# Altium PCB Relay-Switching-Board-v2.0.PcbDoc (part 4 of 5)
Units mil, origin at the board's own origin, x right, y up, seen from the top; angles counter-clockwise.
Board outline 5905.51 x 4330.71 mil, 4 copper layers (Top Layer, Layer 1, Layer 2, Bottom Layer), stack 62.047 mil thick; 211 components, 133 nets, 602 pads, 336 vias.
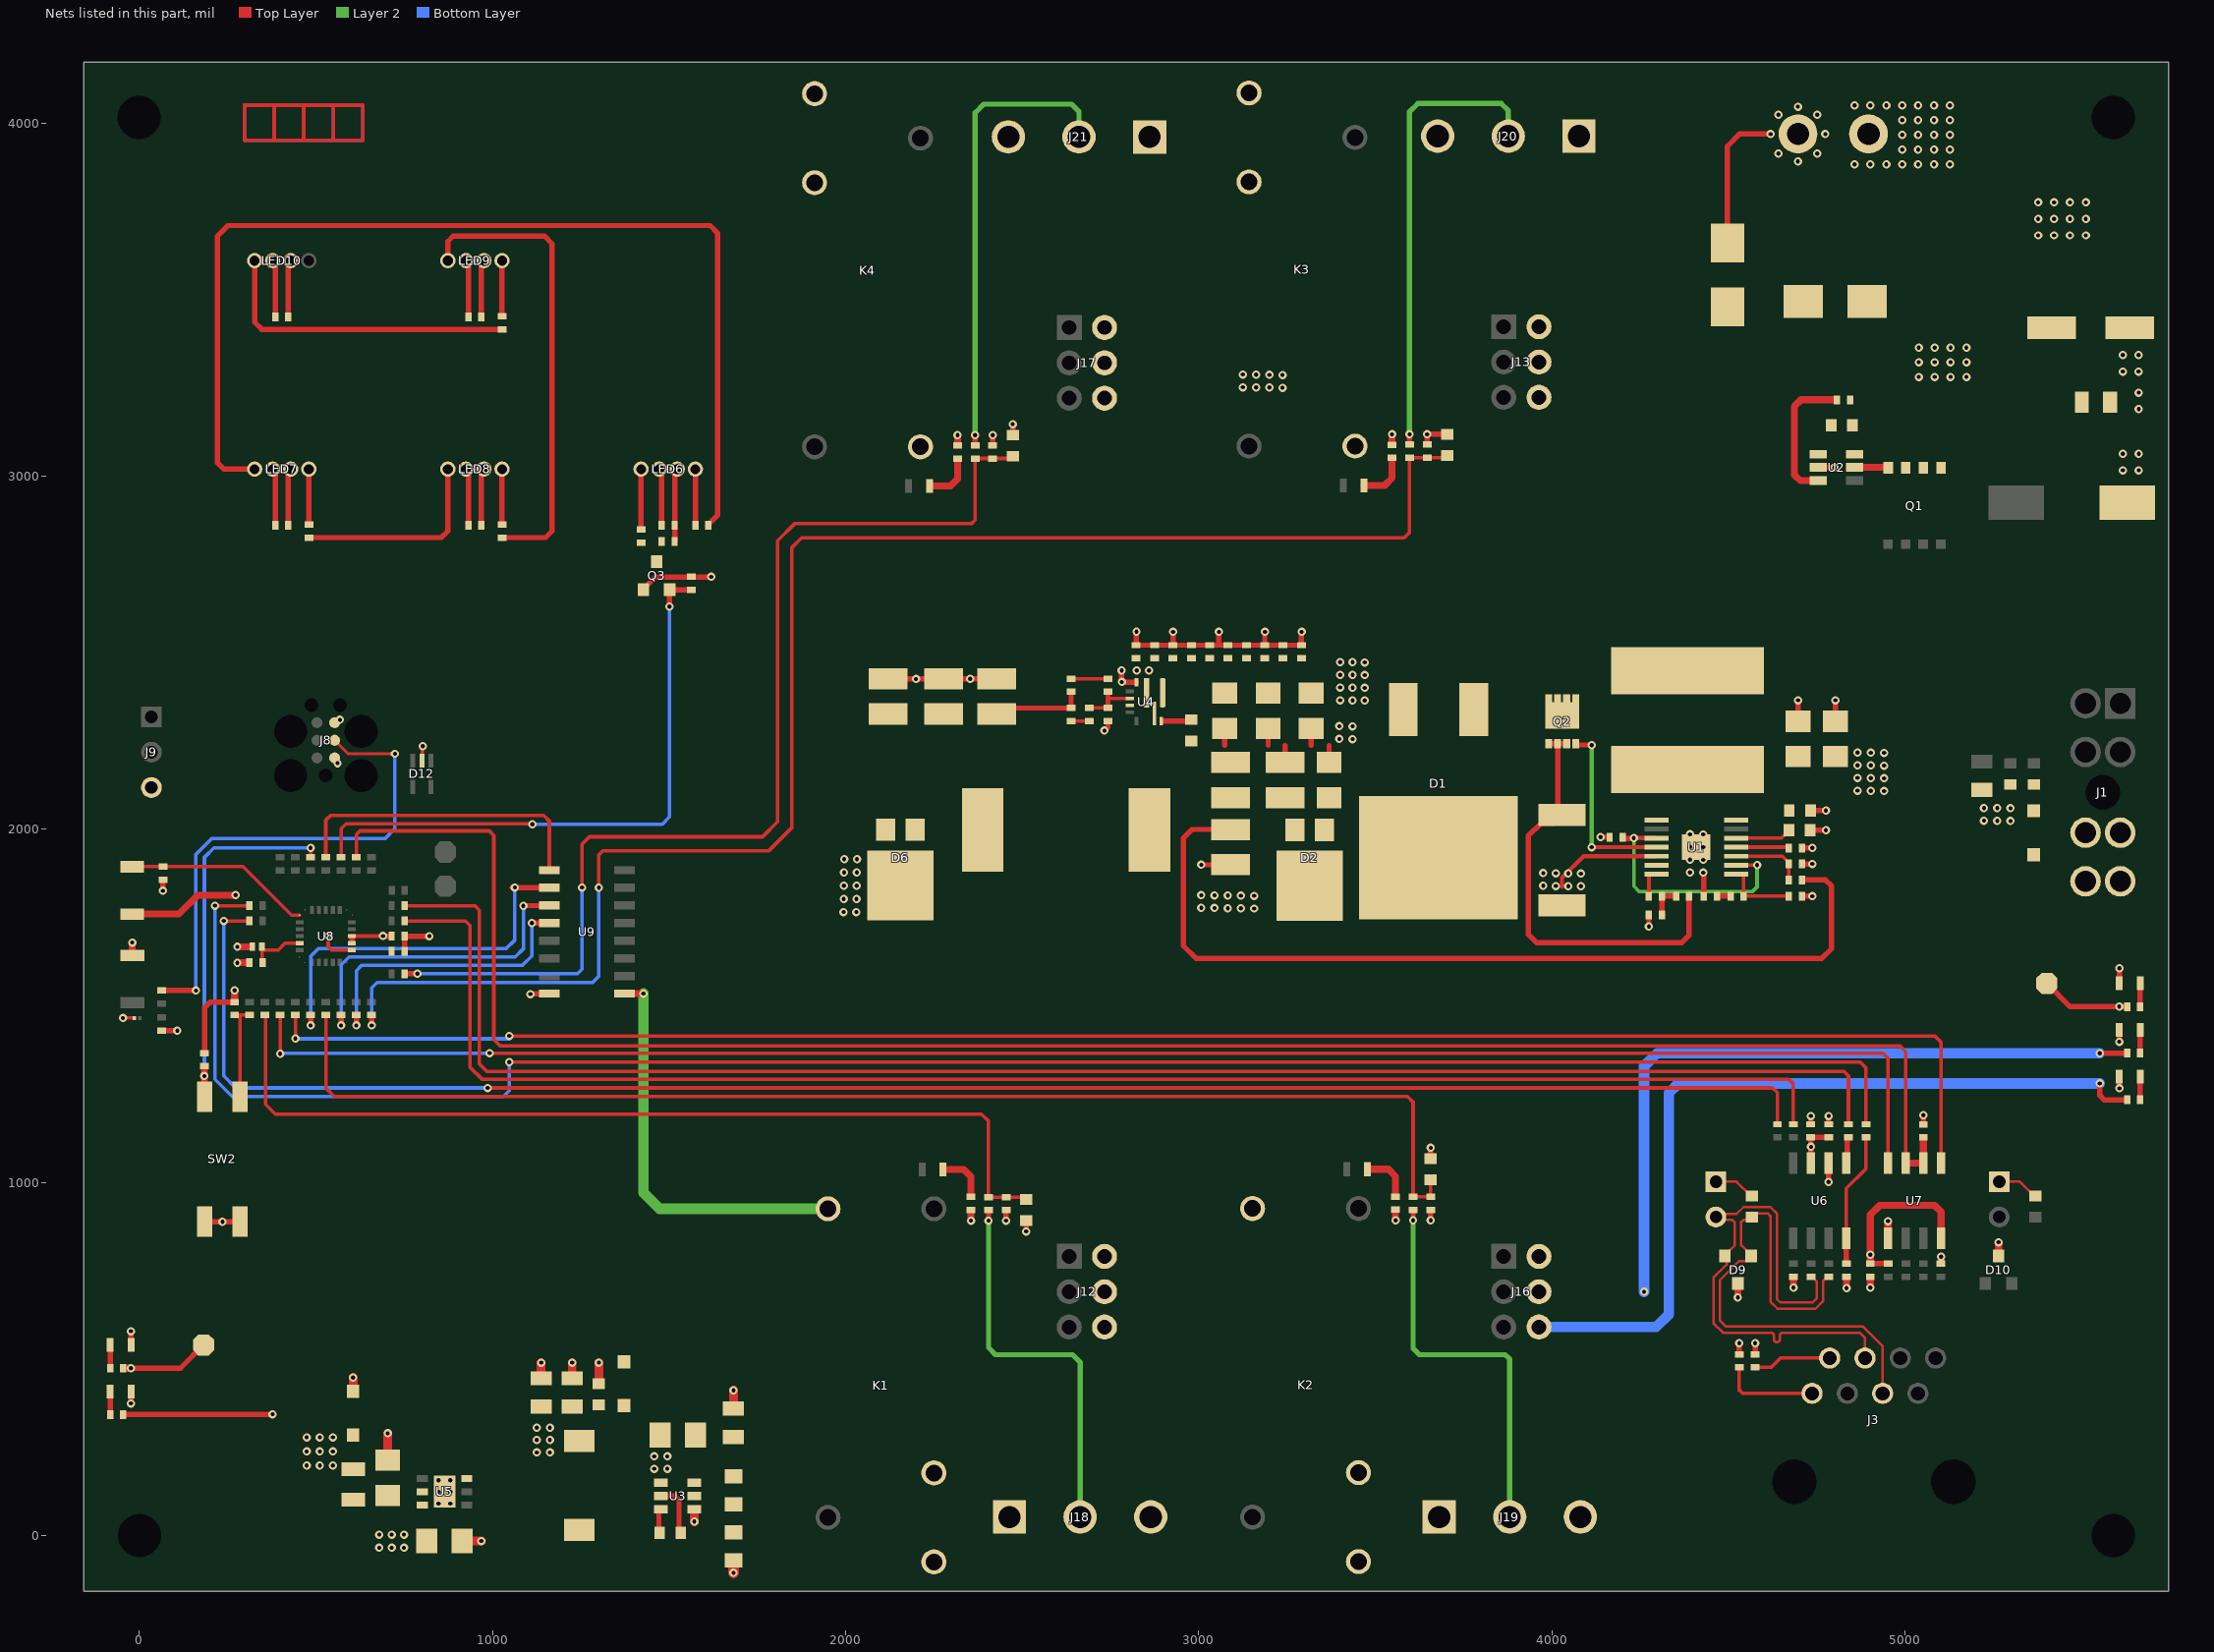
[diagram p4: the nets of this part, all layers, seen from the top]

## Via types
v1: diameter 23.62, hole 11.81, Top Layer to Bottom Layer, tented both sides, 336 vias

## Nets (pads, with @x,y where several pads share a name; then routed paths per layer and width w, separated by ;. In a path a pad name is that pad's centre, name@x,y a point inside that pad or via, vN(x,y) a via of type N, cw(c..) or ccw(c..) an arc to the next point about the centre after c; other vN are vias at no path point) (continued)
5V: C40.2 C41.2 C42.2 C44.2 C48.2 C50.2 C51.2 C52.2 C53.2 D7.2 L3.2 LED6.2 LED7.2 LED8.2 LED9.2 LED10.2 R17.1 R66.2 TP2.1 U3.1 U5.3 | length 1143.5
  Top Layer w15: v1(-23.65,473.9) 116.11,473.9 TP2.1@181.82,539.63 ; C51.2@421.55,2860.63 421.54,3004.53 428.63,3011.62 LED7.2@428.63,3020.63 ; C53.2@421.54,3450.63 421.54,3594.53 428.63,3601.62 LED10.2@428.63,3610.63 ; C52.2@968.67,2860.63 968.67,3004.53 975.76,3011.62 LED8.2@975.76,3020.63 ; C50.2@968.67,3450.64 968.67,3594.53 975.76,3601.62 LED9.2@975.76,3610.63 ; R66.2@1515.91,2814.78 1515.91,3005.21 1523.12,3012.42 LED6.2@1523.12,3020.08
  Top Layer w20: R17.1@-43.64,473.9 v1(-23.65,473.9)
  Top Layer w25: v1(1571.66,39.63) U3.1@1571.66,70.46
  other v1: 679.29,-34.37 714.29,-34.37 749.29,-34.37 679.29,2.63 714.29,2.63 749.29,2.63 1125.54,235.54 1162.54,235.54 1125.54,270.54 1162.54,270.54 1125.54,305.54 1162.54,305.54
12V: D6.3 J12.2 J13.2 J16.2 J17.2 R18.1 | length 2021.6
  Top Layer w15: v1(5551.71,1365.67) 5551.98,1365.94 5628.95,1365.94 R18.1@5629.22,1366.21
  Bottom Layer w30: v1(4261.29,690.57) 4261.29,1328.69 4298.27,1365.67 v1(5551.71,1365.67)
  other v1: 1994.27,1765.63 2030.29,1765.63 1994.74,1803.07 2030.76,1803.07 1995.21,1840.52 2031.23,1840.52 1995.68,1877.96 2031.7,1877.96 1996.15,1915.4 2032.17,1915.4
24V: C1.2 C2.2 C16.2 C22.2 C23.2 C24.2 C25.2 C26.2 C27.2 C28.2 C29.2 C30.2 C31.2 C32.2 C33.2 C34.2 C35.2 C36.2 D4.2 J1.3 J1.4 J1.5 J1.6 J12.4 J13.4 J16.4 J17.4 K1.1 K2.1 K3.1 K4.1 L1.1 R5.1 R11.2 R68.1 R69.1 R70.1 R71.1 TP1.1 U1.1 U1.14 U3.3 U4.8 U9.9 | length 1527.9
  Top Layer w15: TP1.1@5401.78,1563.93 5467.77,1497.94 R5.1@5629.22,1497.94
  Top Layer w20: U9.9@1373.59,1534.63 v1(1427.29,1534.63) ; R71.1@2317.09,3088.08 v1(2317.09,3116.71) ; v1(2355.03,891.98) R68.1@2355.03,920.61 ; R70.1@3547.5,3090.22 v1(3547.5,3118.85) ; v1(3557.45,892.84) R69.1@3557.45,921.47
  Layer 2 w30: v1(1427.29,1534.63) 1427.29,971.63 1473.47,925.46 K1.1@1950.07,925.46
  other v1: 5606.84,1497.94 4940.84,2108.55 4865.96,2109.49 4903.4,2109.02 4940.84,2144.57 4865.96,2145.51 4903.4,2145.04 4940.84,2180.59 4865.96,2181.53 4903.4,2181.06 4940.84,2216.62 4865.96,2217.56 4903.4,2217.09 3470.18,2364.69 3400.29,2365.63 3435.74,2365.16 3470.18,2400.71 3400.29,2401.65 3435.74,2401.18 3470.18,2436.74 3400.29,2437.68 3435.74,2437.21 3400.29,2473.7 3435.74,2473.23 3470.18,2472.76
48V: D2.3 J12.6 J13.6 J16.6 J17.6 R10.1 | length 2357
  Top Layer w15: v1(5551.98,1280.53) 5551.98,1246.37 5564.13,1234.22 5627.73,1234.22 5628.24,1233.7 R10.1@5628.43,1233.7
  Bottom Layer w30: J16.6@3963.68,590.57 4295.32,590.57 4331.17,626.42 4331.17,1252.95 4358.75,1280.53 v1(5551.98,1280.53)
  other v1: 3157.18,1775.69 3082.29,1776.63 3119.74,1776.16 3007.41,1777.57 3044.85,1777.1 3157.18,1811.71 3082.29,1812.65 3119.74,1812.18 3007.41,1813.59 3044.85,1813.12 3237.29,3250.63 3162.41,3251.57 3199.85,3251.1 3124.97,3252.04 3237.29,3286.65 3162.41,3287.59 3199.85,3287.12 3124.97,3288.06
485_DIN_1: R43.1 U7.4 | length 4967.1
  Top Layer w10: v1(398.48,1364.63) R43.1@398.48,1473.41 ; R43.1@398.48,1474.19 R43.1@398.48,1473.41 ; R43.1@398.87,1473.8 R43.1@398.48,1473.41 ; v1(992.04,1366.4) 4937.1,1366.4 4952.29,1351.22 U7.4@4952.29,1055.05
  Bottom Layer w10: v1(398.48,1364.63) 399.37,1365.52 991.16,1365.52 v1(992.04,1366.4)
485_ROUT_1: R45.1 U7.1 | length 5077.3
  Top Layer w10: v1(441.66,1407.63) R45.1@441.66,1474.19 ; v1(1047.29,1415.12) 5084.19,1415.12 5102.29,1397.02 U7.1@5102.29,1055.05
  Bottom Layer w10: v1(441.66,1407.63) 442.42,1406.87 1046.54,1406.87 v1@1047.29,1406.12
AVDD: C57.1 L4.1 U8.5 | length 164.2
  Top Layer w10: L4.1@347.04,1667.45 347.04,1663.51 L4.1@349.92,1660.64 ; L4.1@347.48,1658.33 393.08,1658.33 412.5,1677.76 U8.5@454.2,1677.76 ; C57.1@347.9,1623.12 347.9,1658.33 L4.1@347.9,1664.58
BOOT0: R64.2 SW3.1 U8.1 | length 531.1
  Top Layer w10: SW3.1@-20.67,1894.53 R64.2@66.62,1894.53 293.13,1894.53 431.16,1756.5 U8.1@453.21,1756.5
CAN1_N: D9.2 J3.5 J5.2 R28.2 | length 1543.4
  Top Layer w7: R28.2@4733.99,732.84 4737.49,732.84 4742.99,727.34 4742.99,727.09 4750,720.09 4750,671.29 4739.05,660.35 4646.74,660.35 4636.99,670.1 4636.99,912.53 4619.11,930.4 4542.9,930.4 4523.58,911.09 4473.58,911.09 J5.2@4464.73,902.24 4473.35,893.63 4511.57,893.63 4518.37,886.82 4518.37,821.83 4503.24,806.7 4502.31,806.7 4489.67,794.06 D9.2@4489.67,792.09 4495.02,786.74 4495.02,767.58 4457.96,730.53 4457.96,601.59 4485.09,574.46 4596.66,574.46 4620.36,574.46 cw(c4620.36,565.96) 4628.86,565.96 4628.86,556.27 ccw(c4637.36,556.27) 4645.86,556.27 4645.86,565.96 cw(c4654.36,565.96) 4654.36,574.46 4657.86,574.46 4872.5,574.46 4887.18,559.78 J3.5@4887.18,502.51
CAN1_P: D9.1 J3.4 R23.2 R29.2 | length 1546.5
  Top Layer w7: R23.2@4784,732.84 4778.5,727.34 4774.45,727.34 4768,720.88 4768,663.84 4746.51,642.35 4639.28,642.35 4618.99,662.64 4618.99,905.07 4611.66,912.4 4577.75,912.4 4560.16,894.81 4543.21,894.81 4536.37,887.98 4536.37,822.48 4551.83,807.02 4551.83,804.73 D9.1@4564.47,792.09 4564.47,790.12 4551.83,777.48 4530.37,777.48 4475.96,723.07 4475.96,609.05 4492.55,592.46 4879.95,592.46 4936.95,535.47 J3.4@4936.95,402.74
CAN1_RXD: R27.1 R57.1 | length 4473.3
  Top Layer w10: R57.1@751.26,1740.61 923.84,1740.61 936.52,1727.94 936.52,1326.28 970.14,1292.66 4670.11,1292.66 4683.99,1278.78 R27.1@4683.99,1164.84
CAN1_SHDN: R30.1 R63.1 | length 5021.3
  Top Layer w10: v1(238.84,1740.62) R63.1@312.25,1740.62 ; v1(986.37,1267.66) 4589.03,1267.66 4625.49,1267.66 4638.99,1254.16 R30.1@4638.99,1164.84
  Bottom Layer w10: v1(238.84,1740.62) 238.84,1302.08 273.27,1267.66 v1(986.37,1267.66)
CAN1_STB: R21.1 R62.1 | length 5539.1
  Top Layer w10: v1(214.23,1783.8) R62.1@311.76,1783.8 ; v1(1047.29,1340.82) 4873.35,1340.82 4889.99,1324.18 R21.1@4889.99,1164.84
  Bottom Layer w10: v1(214.23,1783.8) 214.23,1292.27 263.06,1243.44 1030.92,1243.44 1047.29,1259.81 v1(1047.29,1340.82)
CAN1_TXD: R22.1 R58.1 | length 4679.9
  Top Layer w10: R58.1@751.26,1783.79 949.8,1783.79 962.56,1771.03 962.56,1336.17 983.85,1314.87 4826.66,1314.87 4839.99,1301.53 R22.1@4839.99,1164.84
DI_PA1: C58.2 R41.1 R72.1 R76.2 | length 2649.1
  Top Layer w10: R41.1@355.31,1474.19 357.29,1472.2 357.29,1221.04 384.89,1193.44 566.67,1193.44 2384.87,1193.44 2404.77,1173.54 R72.1@2404.77,958.47 R76.2@2454.53,958.48 C58.2@2517.71,958.47
DI_PA5: C59.2 R50.1 R73.1 R77.2 | length 3671.9
  Top Layer w10: R50.1@528.02,1474.19 528.02,1267.66 552.23,1243.44 3591.26,1243.44 3607.19,1227.51 R73.1@3607.19,959.33 R77.2@3660.44,959.33 ; R77.2@3656.95,959.34 C59.2@3656.95,1007.49
DI_PB0: C60.2 R40.1 R74.1 R78.2 | length 4600.1
  Top Layer w10: v1(1301.29,1834.63) 1301.29,1927.87 1312.15,1938.73 1781.55,1938.73 1848.05,2005.23 1848.05,2798.38 1875.12,2825.45 3581.96,2825.45 3597.25,2840.73 R74.1@3597.25,3052.35 3703.68,3052.35 C60.2@3703.68,3058.85
  Top Layer w15: v1(657.55,1444.63) R40.1@657.55,1474.19
  Bottom Layer w10: v1(657.55,1444.63) 657.55,1550.76 673.35,1566.56 1283.5,1566.56 1301.29,1584.35 v1(1301.29,1834.63)
DI_PB1: C61.2 R42.1 R75.1 R79.2 | length 3104.3
  Top Layer w10: v1@787.2,1591.18 v1(787.29,1591.08) ; v1(1253.48,1835.39) 1253.48,1957.84 1274.37,1978.73 1764.98,1978.73 1807.29,2021.04 1807.29,2817.62 1855.12,2865.45 2356.44,2865.45 2366.84,2875.84 R75.1@2366.84,3050.21 ; R75.1@2367.69,3050.21 R79.2@2416.59,3050.21 2473.28,3050.21 C61.2@2473.28,3056.71
  Top Layer w15: R42.1@755.26,1591.18 v1@787.2,1591.18
  Bottom Layer w10: v1(787.29,1591.08) 1240.77,1591.08 1253.48,1603.79 v1(1253.48,1835.39)
DO_PA15: R35.1 R61.1 U7.2 U7.3 | length 5492.4
  Top Layer w10: R61.1@614.37,1920.69 614.37,1985.62 624.24,1995.49 990.89,1995.49 1003.72,1982.66 1003.72,1404.65 1021.06,1387.3 4985.43,1387.3 5002.29,1370.45 U7.3@5002.29,1055.05 ; R35.1@5051.93,1121.98 5051.93,1127.01 R35.1@5052.26,1127.35
  Top Layer w20: U7.3@5002.29,1055.05 U7.2@5052.29,1055.05 ; R35.1@5051.93,1121.98 5052.28,1121.63 U7.2@5052.29,1055.05
GND: C1.1 C2.1 C3.1 C4.1 C5.1 C6.1 C7.2 C8.2 C9.1 C10.1 C11.1 C12.1 C13.1 C16.1 C17.1 C18.1 C19.1 C22.1 C23.1 C24.1 C25.1 C26.1 C27.1 C28.1 C29.1 C30.1 C31.1 C32.1 C33.1 C34.1 C35.1 C36.1 C37.1 C38.1 C39.1 C40.1 C41.1 C42.1 C44.1 C45.1 C46.1 C47.1 C48.1 C49.1 C50.1 C51.1 C52.1 C53.1 C54.1 C55.2 C56.2 C57.2 C58.1 C59.1 C60.1 C61.1 D4.1 D5.2 D7.1 D8.1 D9.3 D10.3 D11.1 D12.2 J2.1 J8.5 J9.3 J18.3 J19.3 J20.3 J21.3 LED1.2 LED2.2 LED3.2 LED4.2 LED5.2 LED6.3 LED7.3 LED8.3 LED9.3 LED10.3 R6.1 R7.1 R8.1 R9.1 R14.1 R16.1 R25.1 R26.1 R31.1 R35.2 R64.1 R76.1 R77.1 R78.1 R79.1 R81.2 SW1.2 SW2.3 SW2.4 U1.5 U1.6 U1.15 U2.2 U3.4 U4.3 U4.9 U4.10 U5.6 U5.7 U6.2 U7.5 U8.16 U9.8 | length 7555
  Top Layer w10: v1@-46.8,1465.51 D11.1@-16.08,1465.51 ; 548.86,3951.38 548.86,4050.85 ; D12.2@800.63,2195.45 v1@800.63,2231.37 ; 381.54,3951.38 381.54,4050.85 ; 381.54,3951.38 297.88,3951.38 297.88,4050.85 381.54,4050.85 ; 381.54,3951.38 465.2,3951.38 ; 381.54,4050.85 465.2,4050.85 ; 465.2,3951.38 632.53,3951.38 632.53,4050.85 548.86,4050.85 ; 465.2,3951.38 465.2,4050.85 ; 465.2,4050.85 548.86,4050.85
  Top Layer w11: v1(535.29,1697.94) 535.29,1666.6 543.82,1658.07 U8.16@601.84,1658.07
  Top Layer w12: 4028.72,1837.6 4028.72,1863.01 4089.65,1923.94 U1.5@4296.43,1923.94
  Top Layer w15: v1(-46.89,1465.43) v1@-46.8,1465.51 ; v1(-23.79,374.3) -23.72,374.37 LED5.2@-23.65,407.91 LED5.2@-23.65,407.91 ; v1(-23.72,578.63) -23.69,578.59 LED3.2@-23.65,539.63 LED3.2@-23.65,539.63 ; C54.1@63.48,1430.52 63.92,1430.07 106.85,1430.07 v1(107.29,1429.63) ; v1(66.26,1826.05) 66.44,1826.23 66.44,1857.36 R64.1@66.62,1857.53 ; SW2.3@185.29,888.91 v1(235.29,888.91) SW2.4@285.29,888.91 ; LED7.3@377.45,3020.63 384.69,3013.39 C51.1@384.69,2860.78 ; LED10.3@377.45,3610.63 384.69,3603.39 C53.1@384.69,3450.78 ; D8.1@604.64,408.24 D8.1@605.29,408.24 ; C56.2@751.27,1654.26 C55.2@751.26,1697.44 751.39,1697.56 821.17,1697.56 v1(821.29,1697.69) ; v1@800.63,2231.37 802.72,2233.47 v1(802.72,2235.8) ; LED8.3@924.58,3020.63 931.81,3013.39 C52.1@931.81,2860.78 ; LED9.3@924.58,3610.63 931.81,3603.39 C50.1@931.81,3450.78 ; v1(1107.29,1533.32) 1107.95,1533.98 1160.34,1533.98 U9.8@1161,1534.63 ; LED6.3@1471.94,3020.08 1471.94,3012.42 1478.91,3005.45 C48.1@1478.91,2860.08 ; R14.1@1682.23,-70.39 R14.1@1682.37,-70.39 ; C39.1@2120.13,2426.76 2121.14,2425.75 v1(2199.02,2425.75) 2352.73,2425.75 2427.15,2425.75 C37.1@2428.16,2426.76 ; R79.1@2416.59,3087.21 v1(2416.59,3116.71) ; v1(2454.53,891.98) R76.1@2454.53,921.48 ; C61.1@2473.27,3116.71 v1(2473.27,3147.49) ; v1(2511.22,861.19) C58.1@2511.22,891.97 ; v1(2733.15,2279.63) 2743.16,2289.64 R16.1@2743.16,2306.58 ; v1(2781.83,2450.1) 2781.83,2417.32 v1(2782.3,2417.32) 2782.77,2416.85 2823.28,2416.85 U4.10@2823.75,2416.38 ; C34.1@2822.88,2521.58 2823.32,2522.01 2823.32,2559.2 v1(2823.75,2559.63) ; C34.1@2822.88,2521.58 C31.1@2978.96,2521.58 3056.96,2521.56 ; C36.1@2926.93,2521.58 v1@2926.93,2558.77 ; v1(3007.29,1899.62) C5.1@3090.4,1899.62 ; v1@3056.96,2558.74 3056.96,2521.56 ; 3073.62,2238.31 3073.75,2238.44 C26.1@3073.75,2285.61 ; C29.1@3187.06,2521.58 v1@3187.06,2558.77 ; 3196.62,2238.31 3196.75,2238.44 C25.1@3196.75,2285.61 ; C3.1@3244.39,2189.54 3244.39,2236.71 3244.52,2236.83 ; C27.1@3291.11,2521.53 v1@3291.11,2558.72 ; C27.1@3291.11,2521.53 3056.96,2521.56 ; 3318.49,2238.31 3318.62,2238.44 C24.1@3318.62,2285.61 ; C6.1@3369.22,2189.53 3369.22,2236.71 3369.34,2236.83 ; R78.1@3647,3089.34 v1(3647,3118.85) C60.1@3703.68,3118.85 ; v1(3656.95,892.84) R77.1@3656.95,922.34 ; C59.1@3656.95,1067.49 v1(3656.94,1098.27) ; v1(4137.83,1978.12) C13.1@4163.76,1978.12 ; v1(4275.02,1724.63) C19.1@4274.98,1757.88 ; v1(4428.84,1877.49) 4430.33,1876 R8.1@4430.33,1810.66 ; D5.2@4497.29,3660.18 4497.29,3934.63 4531.59,3968.93 v1(4619.39,3968.93) ; R26.1@4530.91,513.5 v1(4530.91,544.63) ; R25.1@4575.91,513.5 v1(4575.91,544.63) ; v1(4697.29,2365.63) 4697.57,2365.63 C2.1@4697.57,2305.88 ; C18.1@4708.07,1810.66 v1(4737.57,1810.66) ; R7.1@4708.07,1902.11 v1(4737.57,1902.11) ; C17.1@4708.07,1947.51 v1(4737.57,1947.51) ; C46.1@4733.49,1164.84 4733.7,1165.05 4733.7,1188.06 v1(4733.92,1188.27) ; R6.1@4736.57,1997.91 v1(4776.29,1997.91) ; C16.1@4737.57,2053.45 v1(4776.29,2053.45) ; U2.2@4754.63,3024.99 4754.79,3024.83 4800.03,3024.83 v1(4800.19,3024.67) ; v1(4784,1001.63) U6.2@4783.99,1055.05 ; C47.1@4784,1164.84 4784.08,1164.93 4784.08,1188.19 v1(4784.17,1188.27) ; C1.1@4803.16,2305.88 v1(4803.16,2365.63) ; R35.2@5052.26,1164.35 5052.36,1164.45 5052.36,1190.18 v1(5052.46,1190.27) ; R81.2@5102.29,769.85 R81.2@5102.7,770.26 ; v1(5102.29,790.13) v1@5102.7,789.72 ; v1(5606.84,1398.4) 5607.04,1398.6 5607.04,1431.69 LED4.2@5607.29,1431.94 ; v1(5607.25,1266.63) LED2.2@5607.25,1300.22 ; LED1.2@5607.29,1563.93 v1(5607.29,1606.63)
  Top Layer w20: SW1.2@-20.17,1643.01 v1(-20.17,1679.63) ; v1@278.97,1622.33 C57.2@309.37,1622.33 ; v1(4526.96,674.16) v1(4526.96,674.16) 4527.01,711.66 D9.3@4527.07,711.71 ; v1@4683.99,702.08 R31.1@4683.99,731.2 ; v1@4902,702.08 C49.1@4902,731.19 ; U7.5@4952.29,842.45 v1@4952.29,890.38 ; R81.2@5102.7,771.26 v1@5102.7,790.72 ; v1(5265.07,830.54) 5265.18,830.44 5265.18,793.83 D10.3@5265.29,793.73
  Top Layer w25: D8.1@605.29,408.24 v1(605.29,447.63) ; C45.1@703.4,214.04 v1(703.4,289.63) ; C44.1@914.15,-15.3 v1(968.29,-15.3) ; C40.1@1137.61,445.46 v1(1137.61,489.63) ; C41.1@1225.61,445.46 v1(1225.61,489.63) ; C42.1@1301.24,430.46 v1(1301.24,489.63) ; C23.1@1682.37,359.54 v1(1682.37,411.63)
  Top Layer w30: v1(1682.37,-105.37) R14.1@1682.37,-70.39
  Bottom Layer w10: 381.54,4050.85 381.54,3951.38 ; 465.2,3951.38 465.2,4050.85 ; 548.86,3951.38 548.86,4050.85 ; 632.53,4050.85 632.53,3951.38 381.54,3951.38 ; 632.53,4051.63 297.88,4051.63 297.88,3951.38 381.54,3951.38
  other v1: 847.41,90.77 880.41,90.77 847.41,123.77 880.41,123.77 847.41,156.77 880.41,156.77 1457.95,189.31 1494.95,189.31 1457.95,224.31 1494.95,224.31 4684.26,701.81 4902.27,701.81 4952.02,890.65 277.29,1622.26 4082.18,1838.69 4011.29,1839.63 4046.74,1839.16 3975.85,1840.1 4082.18,1874.71 4011.29,1875.65 4046.74,1875.18 3975.85,1876.12 4391.4,1877.96 4428.84,1913.51 4391.4,1913.98 4428.84,1949.53 4391.4,1950 4428.84,1985.56 4391.4,1986.03 5298.98,2023.61 5224.1,2024.55 5261.54,2024.08 5298.98,2059.63 5224.1,2060.57 5261.54,2060.1 3435.74,2255.61 3398.29,2256.08 3435.74,2291.63 3398.29,2292.1 567.78,2310.36 2352.73,2425.98 2824.16,2450.1 2859.09,2450.1 2927.37,2559.2 3057.4,2559.17 3187.5,2559.2 3291.55,2559.15 5617.29,3016.77 5662.29,3016.77 5617.29,3063.41 5662.29,3063.41 5662.29,3190.05 5662.29,3236.69 5616.9,3296.42 5661.9,3296.42 5616.9,3343.06 5661.9,3343.06 4696.96,3891.35 4642.11,3914.07 4751.82,3914.07 4774.54,3968.93 4642.11,4023.79 4751.82,4023.79 4696.96,4046.51
ID0: R39.1 R55.1 SW2.1 | length 273.6
  Top Layer w10: R55.1@269.63,1473.99 269.73,1474.09 285.63,1474.09 ; SW2.1@285.29,1243.24 285.29,1473.75 285.63,1474.09 ; R39.1@312.13,1474.19 312.03,1474.09 285.63,1474.09
ID1: R49.1 R54.1 SW2.2 | length 1040.3
  Top Layer w10: R49.1@484.84,1920.7 v1(484.84,1947.37)
  Top Layer w20: SW2.2@183.95,1244.58 v1(183.95,1301.29) 184.13,1301.47 R54.1@184.13,1327.03
  Bottom Layer w10: v1(183.95,1301.29) 183.95,1920.29 211.04,1947.37 v1(484.84,1947.37)
IN-1: R46.1 U9.1 | length 889.8
  Top Layer w10: R46.1@528.02,1920.69 527.85,1920.86 527.85,2026.01 541.5,2039.66 1144.89,2039.66 1161,2023.55 U9.1@1161,1884.63
IN-2: R48.1 U9.2 | length 1076.3
  Top Layer w10: R48.1@484.84,1473.31 R48.1@485.28,1473.75
  Top Layer w15: v1(484.84,1444.63) R48.1@484.84,1473.31 ; v1@1056.29,1835.39 1056.67,1835.01 1160.62,1835.01 U9.2@1161,1834.63
  Bottom Layer w10: v1(484.84,1444.63) 484.84,1640.16 506.64,1661.96 1038.62,1661.96 1063.29,1686.63 v1(1063.29,1835.39)
IN-3: R52.1 U9.3 | length 935
  Top Layer w15: v1(571.19,1444.63) R52.1@571.19,1474.19 ; v1@1084.29,1783.63 1084.79,1784.13 1160.5,1784.13 U9.3@1161,1784.63
  Bottom Layer w10: v1(571.19,1444.63) 571.19,1615.94 594.21,1638.96 1064.62,1638.96 1087.29,1661.63 v1(1087.29,1783.63)
IN-4: R56.1 U9.4 | length 841.7
  Top Layer w15: v1(614.37,1444.63) R56.1@614.37,1474.19 ; v1(1111.29,1734.63) U9.4@1161,1734.63
  Bottom Layer w10: v1(614.37,1444.63) 614.37,1599.9 629.43,1614.96 1084.62,1614.96 1111.29,1641.63 v1(1111.29,1734.63)
LED: Q3.2 R44.1 R65.1 | length 1730.6
  Top Layer w10: R44.1@571.2,1920.69 571.2,2001.71 585.33,2015.85 1111.29,2015.85 v1(1112.76,2014.37)
  Top Layer w15: v1(1501.29,2630.63) 1501.56,2630.89 1501.56,2677.88 Q3.2@1501.82,2678.14 ; Q3.2@1502.21,2677.75 R65.1@1563.3,2677.75
  Bottom Layer w10: v1(1112.76,2014.37) 1480.78,2014.37 1501.29,2034.89 v1(1501.29,2630.63)
LED1_DIN: LED6.4 R67.2 | length 171.5
  Top Layer w15: R67.2@1420.76,2848.54 LED6.4@1420.76,3020.08
LED1_DOUT: LED7.4 R24.2 | length 3031.3
  Top Layer w15: LED7.4@326.27,3020.08 239.32,3020.08 221.33,3038.07 221.33,3680.53 250.67,3709.87 1616.56,3709.87 1637.42,3689.01 1637.42,2889.31 1611.7,2863.59 R24.2@1611.7,2860.09
LED2_DOUT: LED8.4 R36.2 | length 576.8
  Top Layer w15: R36.2@479.82,2826.13 855.01,2826.13 873.51,2844.63 LED8.4@873.51,3020.08
LED3_DOUT: LED9.4 R37.2 | length 1327.5
  Top Layer w15: LED9.4@873.51,3610.63 873.51,3664.67 888.91,3680.07 1146.68,3680.07 1168.6,3658.15 1168.6,2844.29 1150.44,2826.13 R37.2@1027.05,2826.13
LED4_DOUT: LED10.4 R38.2 | length 883.4
  Top Layer w15: LED10.4@326.27,3610.63 326.27,3436.42 346.57,3416.13 R38.2@1027.06,3416.13
NetC3_2: C3.2 C4.2 C5.2 C6.2 D1.3 D2.1 D2.2 R3.2 | length 2852.7
  Top Layer w15: C5.2@3090.4,1999.62 2981.38,1999.62 2956.29,1974.53 2956.29,1670.62 2992.4,1634.51 4764.5,1634.51 4792.29,1662.31 4792.29,1839.29 4774.88,1856.7 R3.2@4708.07,1856.7 ; D1.3@3679.26,1919.49 3726.11,1919.49 D1.3@3886.29,1759.31
NetC8_1: C8.1 C9.2 C14.2 D3.2 J2.2 Q1.1 Q1.2 Q1.3 R4.1 U2.6
  other v1: 5039.33,3281.07 5084.33,3281.07 5129.33,3281.07 5174.33,3281.07 5039.33,3322.71 5084.33,3322.71 5129.33,3322.71 5174.33,3322.71 5039.33,3364.35 5084.33,3364.35 5129.33,3364.35 5174.33,3364.35 5377.33,3682.07 5422.33,3682.07 5467.33,3682.07 5512.33,3682.07 5377.33,3728.71 5422.33,3728.71 5467.33,3728.71 5512.33,3728.71 5377.33,3775.35 5422.33,3775.35 5467.33,3775.35 5512.33,3775.35 4857.33,3883.43 4902.33,3883.43 4947.33,3883.43 4992.33,3883.43 5037.33,3883.43 5082.33,3883.43 5127.33,3883.43 4992.33,3925.07 5037.33,3925.07 5082.33,3925.07 5127.33,3925.07 4992.33,3966.71 5037.33,3966.71 5082.33,3966.71 5127.33,3966.71 4992.33,4008.35 5037.33,4008.35 5082.33,4008.35 5127.33,4008.35 4857.33,4049.99 4902.33,4049.99 4947.33,4049.99 4992.33,4049.99 5037.33,4049.99 5082.33,4049.99 5127.33,4049.99
NetC13_2: C13.2 U1.3 U1.9 | length 718.4
  Top Layer w10: U1.9@4522.08,1898.35 4522.22,1898.49 4581.16,1898.49 v1(4581.29,1898.63)
  Top Layer w12: v1(4232.29,1975.63) 4232.55,1975.38 4296.18,1975.38 U1.3@4296.43,1975.12
  Top Layer w15: C13.2@4200.76,1978.12 4200.76,1975.84 4202.26,1974.34 4231,1974.34 v1(4232.29,1975.63)
  Layer 2 w10: v1(4232.29,1975.63) 4232.29,1838.59 4247.72,1823.16 4567.44,1823.16 4581.29,1837.02 v1(4581.29,1898.63)
NetC14_1: C14.1 U2.1
NetC15_1: C15.1 R8.2 | length 38.8
  Top Layer w15: R8.2@4467.33,1810.66 C15.1@4506.16,1810.66
NetC15_2: C15.2 C18.2 U1.8 | length 210.1
  Top Layer w10: U1.8@4522.08,1872.76 4541.41,1872.76 4543.16,1871.01 C15.2@4543.16,1810.66 C18.2@4671.07,1810.66
NetC17_2: C17.2 U1.11 | length 149.8
  Top Layer w10: U1.11@4522.08,1949.53 4669.05,1949.53 C17.2@4671.07,1947.51
NetC19_2: C19.2 R1.2 R2.1 | length 92.7
  Top Layer w15: C19.2@4311.98,1757.88 R1.2@4312.02,1810.66 R2.1@4351.92,1810.67
NetC20_1: C20.1 L3.1 U3.5 | length 150.6
  Top Layer w15: U3.5@1474.95,112.01 U3.5@1477.17,112.01 1516.05,112.01 1528.27,99.79 C20.1@1528.27,7.6
NetC20_2: C20.2 U3.6 | length 68.6
  Top Layer w15: C20.2@1471.09,7.6 1471.09,70.75 U3.6@1474.95,74.61
NetC21_1: C21.1 L2.1 U4.6
NetC21_2: C21.2 U4.7 | length 82.3
  Top Layer w15: U4.7@2898.68,2306.14 2974.69,2306.14 C21.2@2979.12,2310.57
NetC37_2: C37.2 C38.2 C39.2 D6.1 D6.2 L2.2 R12.2 R13.2 | length 263.6
  Top Layer w10: C37.2@2428.16,2326.76 C37.2@2444.97,2343.58
  Top Layer w15: C37.2@2444.97,2343.58 R13.2@2638.78,2343.58 R12.2@2638.78,2389.57
NetC43_1: C43.1 R15.1 R16.2 U4.2 | length 160.5
  Top Layer w10: R15.1@2690.65,2343.58 R16.2@2743.16,2343.58 ; 2743.51,2370.57 2744.05,2371.1 U4.2@2805.24,2371.1
  Top Layer w15: R16.2@2743.16,2343.58 C43.1@2743.15,2389.56
NetC43_2: C43.2 R12.1 | length 104.4
  Top Layer w10: R12.1@2638.78,2426.57 C43.2@2743.15,2426.56
NetC45_2: C45.2 F1.1 U5.2
NetD1_1: D1.1 D1.2 L1.2 Q2.5 Q2.6 Q2.7 Q2.8
NetD3_1: D3.1 D5.1
NetJ3_7: J3.7 R25.2 | length 221.9
  Top Layer w10: R25.2@4575.91,476.5 4621.76,476.5 4648,502.74 J3.7@4786.94,502.74
NetJ3_8: J3.8 R26.2 | length 274.4
  Top Layer w10: R26.2@4530.91,476.5 4530.91,411.97 4540.14,402.74 J3.8@4736.95,402.74
NetJ5_1: J5.1 R29.1 | length 116.2
  Top Layer w7: J5.1@4464.73,1002.24 4523.25,1002.24 R29.1@4564.04,961.45
NetJ6_1: J6.1 R34.1 | length 116.2
  Top Layer w7: J6.1@5266.95,1002.24 5325.47,1002.24 R34.1@5366.25,961.45
NetJ8_3: J8.3 R47.1 | length 1475
  Top Layer w8: J8.3@553.02,2252.22 591.21,2214.03 v1(723.69,2214.03)
  Top Layer w15: R47.1@63.32,1543.79 63.4,1543.71 160.06,1543.71 v1(160.14,1543.63)
  Bottom Layer w10: v1(160.14,1543.63) 160.14,1929.47 204.87,1974.21 696.2,1974.21 723.69,2001.69 v1(723.69,2214.03)
NetJ18_1: J18.1 K1.4
NetJ18_2: J18.2 K1.3 R72.2 | length 1103.7
  Top Layer w15: v1(2404.77,891.97) R72.2@2404.77,921.47
  Layer 2 w15: v1(2404.77,891.97) 2404.77,532.42 2424.9,512.3 2642.68,512.3 2664,490.98 J18.2@2664,52.77
NetJ19_1: J19.1 K2.4
NetJ19_2: J19.2 K2.3 R73.2 | length 1125.5
  Top Layer w15: v1(3607.19,892.83) R73.2@3607.19,922.33
  Layer 2 w15: v1(3607.19,892.83) 3607.19,529.77 3624.66,512.3 3868.04,512.3 3880.84,499.5 J19.2@3880.84,52.77
NetJ20_1: J20.1 K3.4
NetJ20_2: J20.2 K3.3 R74.2 | length 1313
  Top Layer w15: R74.2@3597.25,3089.35 v1(3597.24,3118.85)
  Layer 2 w15: v1(3597.24,3118.85) 3597.24,4032.29 3620.59,4055.63 3856.65,4055.63 3876.88,4035.4 J20.2@3876.88,3963.06
NetJ21_1: J21.1 K4.4
NetJ21_2: J21.2 K4.3 R75.2 | length 1326.3
  Top Layer w15: R75.2@2366.84,3087.21 v1(2366.83,3116.71)
  Layer 2 w15: v1(2366.83,3116.71) 2366.83,4029.28 2391.04,4053.49 2639.63,4053.49 2660.9,4032.23 J21.2@2660.9,3960.92
NetLED1_1: LED1.1 R5.2 | length 66.1
  Top Layer w15: R5.2@5666.22,1497.94 5666.22,1563.93 LED1.1@5666.3,1563.93
NetLED2_1: LED2.1 R10.2 | length 65.8
  Top Layer w15: R10.2@5666.23,1234.5 5666.23,1300.22 LED2.1@5666.3,1300.22
NetLED3_1: LED3.1 R17.2 | length 65.6
  Top Layer w15: R17.2@-82.66,473.95 LED3.1@-82.66,539.59
NetLED4_1: LED4.1 R18.2 | length 65.8
  Top Layer w15: R18.2@5666.22,1366.21 5666.22,1431.94 LED4.1@5666.3,1431.94
NetLED5_1: LED5.1 R19.2 | length 65.6
  Top Layer w15: R19.2@-82.67,342.22 LED5.1@-82.71,407.91
NetLED6_1: LED6.1 R24.1 | length 160.2
  Top Layer w15: LED6.1@1574.3,3020.08 1574.5,3019.88 1574.5,2860.29 R24.1@1574.69,2860.09
NetLED7_1: LED7.1 R36.1 | length 156.9
  Top Layer w15: R36.1@479.82,2863.13 LED7.1@479.81,3020.08
NetLED8_1: LED8.1 R37.1 | length 156.9
  Top Layer w15: R37.1@1027.05,2863.13 LED8.1@1027.05,3020.08
NetLED9_1: LED9.1 R38.1 | length 157.5
  Top Layer w15: R38.1@1027.06,3453.13 LED9.1@1027.05,3610.63
NetLED11_1: LED11.1 R68.2 | length 144.1
  Top Layer w20: LED11.1@2275.76,1036.63 2334.82,1036.63 2355.04,1016.42 R68.2@2355.04,959.98
NetLED12_1: LED12.1 R69.2 | length 144.1
  Top Layer w20: LED12.1@3478.18,1037.49 3537.24,1037.49 3557.45,1017.28 R69.2@3557.45,960.84
NetLED13_1: LED13.1 R70.2 | length 144.1
  Top Layer w20: LED13.1@3468.22,2974.2 3527.28,2974.2 3547.5,2994.41 R70.2@3547.5,3050.85
NetLED14_1: LED14.1 R71.2 | length 144.1
  Top Layer w20: LED14.1@2237.82,2972.06 2296.88,2972.06 2317.09,2992.27 R71.2@2317.09,3048.71
NetQ1_4: Q1.4 U2.5 | length 94.9
  Top Layer w10: Q1.4@4951.29,3024.99 Q1.4@4952.29,3023.99
  Top Layer w20: U2.5@4857.78,3024.99 Q1.4@4951.29,3024.99
NetQ2_1: Q2.1 Q2.2 Q2.3 R2.2 R9.2 | length 1241.8
  Top Layer w15: Q2.1@3990.87,2242.54 Q2.2@4016.47,2242.54 ; Q2.3@4042.06,2242.54 Q2.2@4016.47,2242.54 ; R2.2@4388.92,1810.67 4388.92,1700.26 4367.29,1678.63 3957.48,1678.63 3933.26,1702.85 3933.26,1981.27 3968.45,2016.45 4004.73,2016.45 R9.2@4028.72,2040.45 4016.47,2052.7 Q2.2@4016.47,2242.54
NetQ2_4: Q2.4 U1.4 | length 519.7
  Top Layer w12: v1(4113.02,1949.53) U1.4@4296.43,1949.53
  Top Layer w15: Q2.4@4067.65,2242.54 4067.65,2241.26 4069.99,2238.92 v1@4112.67,2238.92
  Layer 2 w12: v1(4113.02,1949.53) v1(4113.02,2238.57)
NetQ3_3: Q3.3 R66.1 R67.1
NetR1_1: R1.1 U1.7 | length 82.5
  Top Layer w10: R1.1@4275.02,1810.66 4275.02,1871.01 4276.77,1872.76 U1.7@4296.43,1872.76
NetR3_1: R3.1 R7.2 U1.10 | length 205.5
  Top Layer w10: U1.10@4522.08,1923.94 4652.74,1923.94 4671.07,1905.61 R7.2@4671.07,1902.11 R3.1@4671.07,1856.7
NetR4_2: R4.2 U2.3 | length 392.9
  Top Layer w20: U2.3@4754.63,2987.59 4703.53,2987.59 4687.29,3003.82 4687.29,3198.2 4705.47,3216.38 R4.2@4804.27,3216.38
NetR6_2: R6.2 U1.12 | length 160.4
  Top Layer w10: U1.12@4522.08,1975.12 4650.23,1975.12 4660.51,1985.41 4661.57,1985.41 4671.57,1995.41 R6.2@4671.57,1997.91
NetR11_1: R11.1 R14.2 U3.2
NetR13_1: R13.1 R15.2 | length 51.9
  Top Layer w10: R13.1@2638.78,2306.58 R15.2@2690.65,2306.58
NetR20_1: R20.1 R21.2 U6.8 | length 375.8
  Top Layer w10: U6.8@4833.99,842.45 4833.99,982.84 4889.29,1038.14 R21.2@4889.29,1127.7
  Top Layer w15: R20.1@4833.99,774.85 U6.8@4833.99,842.45
NetR22_2: R22.2 U6.1 | length 76.3
  Top Layer w15: U6.1@4833.99,1055.05 4836.81,1057.87 4836.81,1126.34 4838.31,1127.84 R22.2@4839.99,1127.84